# Altium PCB PS3604LR.PcbDoc (part 3 of 3)
Units mm, origin at the board's own origin, x right, y up, seen from the top; angles counter-clockwise.
Board outline 116.5 x 26.5 mm, 4 copper layers (Top Layer, inner 1, inner 2, Bottom Layer), stack 1.571 mm thick; 223 components, 126 nets, 609 pads, 259 vias.
Unrouted connection lines stored in the file: 18.
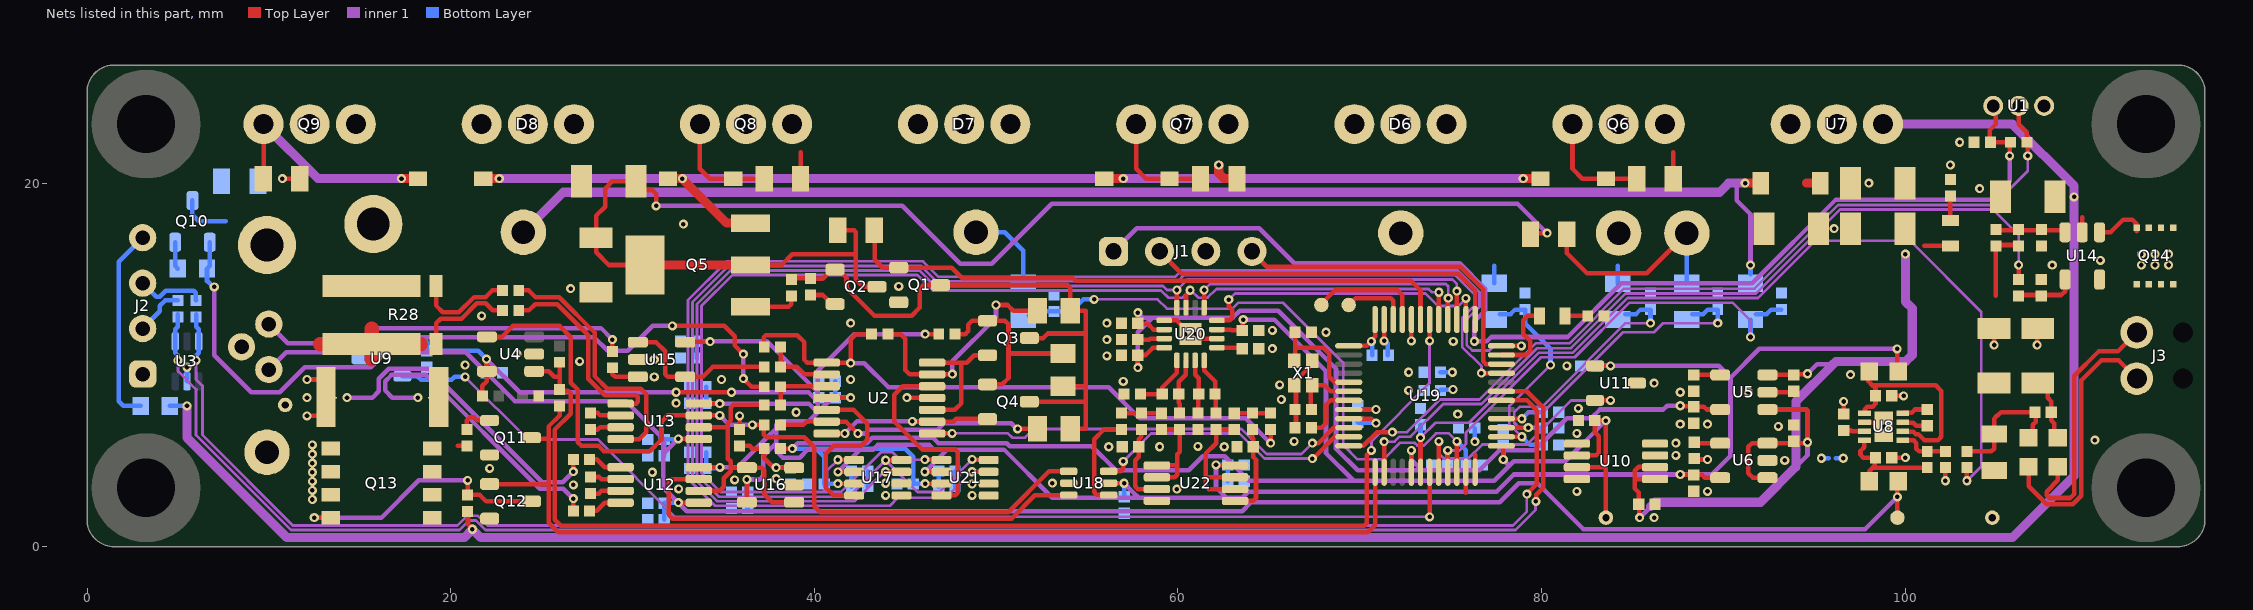
[diagram p4: the nets of this part, all layers, seen from the top]

## Via types
v1: diameter 0.5, hole 0.25, Top Layer to Bottom Layer, tented both sides, 218 vias
v2: diameter 1, hole 0.3, Top Layer to Bottom Layer, 32 vias
v3: diameter 0.5, hole 0.25, Top Layer to Bottom Layer, tented bottom, 6 vias
v4: diameter 0.5, hole 0.4, Top Layer to Bottom Layer, tented both sides, 3 vias

## Nets (pads, with @x,y where several pads share a name; then routed paths per layer and width w, separated by ;. In a path a pad name is that pad's centre, name@x,y a point inside that pad or via, vN(x,y) a via of type N, cw(c..) or ccw(c..) an arc to the next point about the centre after c; other vN are vias at no path point) (continued)
0V: B6.1 B11.1 C3.1 C5.1 C6.1 C7.2 C8.1 C9.1 C11.1 C13.1 C14.1 C15.1 C16.1 C17.1 C18.1 C19.1 C20.1 C22.1 C24.2 C25.2 C26.1 C27.1 C28.1 C29.1 C30.1 C31.2 C32.2 C33.1 C34.1 C35.1 C36.1 C37.1 C38.1 C40.2 C41.2 C42.1 C43.1 C44.1 C45.1 C46.1 C48.1 C49.2 C50.1 C51.1 C52.1 C53.1 C54.1 C55.1 C56.1 C57.1 C58.2 C59.1 C62.1 C63.1 C64.1 C65.1 C66.2 C67.2 C68.1 C69.1 C70.1 C71.1 C74.1 C75.1 C76.1 C77.1 C78.1 C79.1 C80.1 J1.3 J2.1 n1.1 n3.1 Q1.2 Q11.2 Q12.2 Q13.1 Q13.2 Q13.3 R11.1 R20.1 R25.1 R26.1 R36.1 R39.1 R41.1 R42.1 R46.1 R48.1 R52.1 R53.1 R58.1 R60.1 R63.2 TP1.1 TP2.1 U1.1 U2.11 U3.2 U4.2 U5.2 U6.2 U7.2 U9.3 U10.3 U10.4 U10.5 U10.8 U11.3 U14.5 U15.2 U16.2 U17.5 U17.6 U18.2 U19.8 U19.23 U19.44 U19.47 U20.1 U20.10 U20.17 U21.5 U21.6 U22.4 X1.2 X1.4 | length 23
  Top Layer w0.2: X1.4@66.386,9.032 X1.2@67.386,10.032
  Top Layer w0.25: 12.4,7.2 R26.1@12.75,7.2 ; 12.4,9.2 R26.1@12.75,9.2 ; R26.1@13.15,8.25 R26.1@13.15,8.8 ; R41.1@35.9,6.45 v1(35.9,7.2) ; v1(37.9,3.75) v1@37.968,3.75 ; U16.2@38.74,3.56 U16.2@38.9,3.4 ; v1(45.1,8.2) 45.109,8.191 46.195,8.191 U2.11@46.245,8.141 ; U20.1@59.25,12.45 59.95,12.45 U20.17@60.7,11.7 60.95,11.45 U20.10@62.15,11.45 ; C75.1@66.5,6.55 X1.4@66.5,8.8 ; U19.8@69.45,7.55 v1(70.9,7.55) ; v1(71.35,11.322) U19.47@71.35,12.5 ; v1(72.85,11.322) U19.44@72.85,12.5 ; 75.85,2.975 U19.23@75.85,4.1 ; C9.1@88.386,4.8 v1(89.136,4.8) ; U5.2@92.436,8.5 93.836,8.5 C5.1@93.886,8.55 ; v1(104.9,11.1) C45.1@104.9,12 ; v1(107.261,11.1) 107.261,11.961 C44.1@107.3,12 ; C35.1@107.5,14.65 C35.1@107.5,14.7 ; R42.1@107.5,16.55 R42.1@107.5,16.6
  Bottom Layer w0.25: U3.2@5.5,9.1 v1(5.5,9.875) ; C54.1@42.95,3.31 C56.1@42.95,4.163 ; C74.1@47.75,3.31 C76.1@47.75,4.163 ; C68.1@71.536,10.531 v1@71.536,11.181 ; v1(95.4,4.869) n1.1@95.8,4.869
  other v1: 86.2,1.6 12.4,2.6 43.927,2.825 48.682,2.825 81.95,3.05 89.136,3.05 12.4,3.1 59.948,3.175 32.537,3.188 26.75,3.4 48.682,3.45 43.927,3.494 53.1,3.5 12.4,3.6 35.626,3.677 12.4,4.1 31.1,4.1 22.15,4.316 12.4,4.6 93.386,4.75 87.4,5.025 12.4,5.1 56.203,5.504 59,5.502 62.553,5.502 61.1,5.525 12.4,5.6 87.4,5.7 66.4,5.8 110.444,5.869 81.95,6.24 93.036,6.625 87.636,6.75 89.136,6.75 12.1,7.2 75.4,7.3 39,7.4 82.038,7.61 32.4,7.9 65.7,8.1 12.1,8.2 87.636,8.5 91.386,8.5 72.7,8.6 65.6,8.9 86.2,9 57,9.1 12.1,9.2 34.9,9.2 42,9.2 31.2,9.35 97,9.469 72.7,9.6 81.4,9.95 20.8,10 27.093,10.2 31.2,10.3 56.1,10.5 23.65,10.6 65.2,10.9 75.15,11.3 56.1,11.4 60.4,11.7 61,11.7 68.15,11.8 65.2,11.9 42,12.3 56.1,12.3 21.71,12.7 26.6,14.2 44.65,14.325 108.099,15.497 110.75,15.75 96.1,17.5 32.8,17.75 104.1,19.7 98.012,20 102.5,21 103,22.25
  other v4: 104.8,1.6 10.9,7.8
+3.3V: C3.2 C17.2 C63.2 C64.2 C65.2 C66.1 C67.1 C68.2 C71.2 J1.1 R4.2 U1.3 U5.5 U19.1 U19.9 U19.17 U19.24 U19.48 U20.2 U20.4 | length 123
  Top Layer w0.25: v1(57.8,9.856) C66.1@57.8,10.531 57.819,10.55 58.237,10.55 58.631,10.944 59.244,10.944 U20.4@59.25,10.95 ; v1(57.8,12.879) C67.1@57.8,12.3 57.827,12.273 58.339,12.273 58.662,11.95 U20.2@59.25,11.95 ; U19.9@69.45,7.05 70.65,7.05 v1(70.9,6.8) ; U19.1@69.498,11.05 70.4,11.05 v1(70.65,11.3) 70.65,11.368 70.85,11.568 U19.48@70.85,12.5 ; U19.17@72.85,4.1 v1@72.85,5.123 ; U19.24@76.35,4.1 76.35,5.054 ; v1(87.636,7.756) 87.664,7.728 88.358,7.728 C17.2@88.386,7.7 88.936,7.7 89.086,7.55 U5.5@89.836,7.55 ; U1.3@104.98,24.25 104.98,23.23 104.65,22.9 104.65,22.25 R4.2@105.8,22.25 105.75,22.2 v1(105.75,21.5)
  inner 1 w0.25: J1.1@56.46,16.25 57.735,17.525 64.475,17.525 66.4,15.6 75.5,15.6 76.9,14.2 76.9,13 76.304,12.404 76.304,11.315 v1(76.315,11.304) ; v1(57.8,9.856) 57.8,11.795 58.598,12.594 ; v1(57.8,12.879) 58.085,12.594 58.598,12.594 ; v1(72.849,5.299) 72.849,4.779 73.428,4.2 ; v1@76.319,11.304 77.004,11.304 77.24,11.54 81.44,11.54 84.4,14.5 91.6,14.5 96.2,19.1 104.755,19.1 105.75,20.095 v1(105.75,21.5) ; v1(87.636,7.756) 86.913,7.756 86.707,7.55 83.22,7.55 82.735,7.065 81.4,7.065 79.635,5.3 77.694,5.3 76.594,4.2 73.428,4.2 ; 58.598,12.594 63.012,12.594 63.399,12.981 65.519,12.981 68.7,9.8 68.7,5.4 69.9,4.2 73.428,4.2
  Bottom Layer w0.25: C63.2@69.9,6.85 69.925,6.825 70.875,6.825 v1(70.9,6.8) ; v1@70.636,11.281 70.686,11.231 C68.2@70.686,10.531 ; C64.2@74.45,8.6 74.475,8.625 75.111,8.625 v1(75.136,8.65) ; C65.2@74.457,9.607 C65.2@74.45,9.6 v1(75.1,9.6) ; v1@76.33,5.788 76.33,6.526 C71.2@76.336,6.531
  other v1: 76.336,5.788
+5V: C7.1 C15.2 C16.2 C22.2 C24.1 C25.1 C26.2 C27.2 C38.2 C40.1 C41.1 C43.2 C48.2 C49.1 C54.2 C55.2 C56.2 C57.2 C58.1 C74.2 C76.2 L1.1 R10.2 R12.2 U2.4 U4.5 U6.5 U9.1 U11.1 U12.8 U13.8 U15.5 U16.5 U17.2 U18.5 U21.2 U22.8 | length 175
  Top Layer w0.25: R10.2@21.75,8.3 21.75,8.85 22,9.1 U4.5@22,9.65 21.975,9.675 v1(21.975,10.323) ; v1(32.4,8.5) v1(35.45,8.498) ; U15.5@32.9,11.25 32.915,11.265 34.26,11.265 v1(34.275,11.28) ; U12.8@33.65,4.375 33.656,4.369 34.804,4.369 v1(34.81,4.362) ; U13.8@33.65,7.875 v1(34.804,7.875) ; U16.5@36.3,2.45 v1(36.3,3.7) ; U2.4@40.586,8.231 40.626,8.191 41.991,8.191 v1(42,8.2) ; v1(41.307,4.122) 41.309,4.123 42.198,4.123 U17.2@42.2,4.125 ; v1(46.09,4.125) U21.2@47,4.125 ; v1(46.1,11.7) R12.2@46.85,11.7 ; U18.5@56.2,3.5 56.203,3.497 57.047,3.497 v1(57.05,3.494) ; v1(62.1,4.5) 62.112,4.488 63.137,4.488 U22.8@63.15,4.475 ; U11.1@82.95,9.95 v1(83.8,9.95) ; v1(87.636,3.975) 87.648,3.963 88.373,3.963 C16.2@88.386,3.95 88.836,3.95 88.986,3.8 U6.5@89.836,3.8 ; v1(99.568,10.89) 99.568,9.692 L1.1@99.625,9.635
  inner 1 w0.25: v1(21.975,10.323) 23.798,8.5 v1(32.4,8.5) ; v1(34.275,11.28) 34.295,11.3 37.4,11.3 40.186,8.514 ; v1(34.804,7.875) 39.711,7.875 40.186,7.4 ; v1(34.81,4.362) 35.762,4.362 37.45,6.05 37.9,6.5 ; v1(35.45,8.498) 39.687,8.498 40.186,8 ; v1(36.3,3.7) 37,3.7 37.2,3.9 37.2,5 37.9,5.7 ; v1(41.307,4.122) 42.534,5.349 ; v1(42,8.2) 40.986,8.2 40.186,7.4 ; v1(46.09,4.125) 46.094,4.125 47.318,5.349 ; v1(46.1,11.7) 42.2,11.7 40.186,9.686 40.186,8.514 ; v1(57.05,3.494) 57.535,3.009 57.844,2.7 ; v1(62.1,4.5) 62.1,3.28 62.68,2.7 ; v1(83.8,9.95) 89.75,9.95 90.4,9.3 ; v1(99.568,10.89) 91.99,10.89 90.4,9.3 ; 37.9,5.7 37.9,6.5 ; 37.9,5.7 37.9,5.281 38.281,4.9 39.2,4.9 39.649,5.349 42.534,5.349 ; 37.9,6.5 37.9,6.7 38.1,6.9 39.686,6.9 40.186,7.4 ; 40.186,7.4 40.186,8 ; 40.186,8 40.186,8.514 ; 42.534,5.349 43.249,5.349 43.5,5.6 46.325,5.6 46.576,5.349 47.318,5.349 ; 47.318,5.349 50.437,5.349 53.086,2.7 57.844,2.7 ; 57.844,2.7 62.68,2.7 ; 62.68,2.7 63.535,2.7 63.867,3.032 77.532,3.032 78.475,3.975 89.375,3.975 90.4,5 90.4,9.3
  Bottom Layer w0.25: U9.1@17.35,11.28 18.171,11.28 18.3,11.409 18.539,11.409 18.685,11.263 C15.2@18.685,10.78 21.518,10.78 v1(21.975,10.323) 21.963,10.311 21.963,9.582 C7.1@21.95,9.57 C7.1@21.943,9.562 ; C38.2@33.55,10.38 C41.1@33.55,11.3 33.56,11.29 34.265,11.29 v1(34.275,11.28) ; C27.2@34.05,5.2 C25.1@34.05,4.3 34.081,4.331 34.779,4.331 v1(34.81,4.362) ; C26.2@34.05,8.8 C24.1@34.05,7.9 34.062,7.888 34.791,7.888 v1(34.804,7.875) ; v1(36.3,3.7) 36.325,3.675 36.325,2.125 C43.2@36.35,2.1 ; C48.2@41.15,9.1 C49.1@41.15,8.2 v1(42,8.2) ; v1(41.307,4.122) 41.328,4.142 42.03,4.142 C56.2@42.05,4.163 C54.2@42.05,3.31 ; v1(46.09,4.125) 46.109,4.144 46.831,4.144 C76.2@46.85,4.163 C74.2@46.85,3.31 ; C57.2@57.05,2.75 v1(57.05,3.494) ; v1(62.1,4.5) C58.1@62.75,4.5 C55.2@62.75,3.6 ; C22.2@83.05,9.95 v1(83.8,9.95)
+REF: C28.2 C59.2 C62.2 C77.2 C80.2 R40.2 TP4.1 U10.6 U10.7 U17.3 U19.25 U20.11 U21.3 | length 89.4
  Top Layer w0.25: R40.2@38.15,5.4 v1(38.8,5.4) ; v1(41.303,3.475) U17.3@42.2,3.475 ; v1(46.1,3.475) U21.3@47,3.475 ; U20.11@62.15,11.95 62.9,11.95 62.95,11.9 C77.2@63.55,11.9 63.575,11.925 63.575,12.475 v1(63.6,12.5) ; v1(77.9,4.8) U19.25@77.9,5.5 ; U10.7@81.95,4.375 83.55,4.375 ; U10.6@81.95,5.025 83.004,5.025 83.15,5.171 83.15,6.09 82.94,6.3 C28.2@82.94,6.946 ; C28.2@82.938,6.949 C28.2@82.94,6.946 ; v4(83.55,1.603) v1(83.55,6.944) 83.548,6.946 C28.2@82.94,6.946
  inner 1 w0.25: v1(38.8,5.4) 39.1,5.7 42.9,5.7 43.2,6 46.534,6 46.834,5.7 50.581,5.7 50.756,5.525 55.275,5.525 56.6,4.2 60.6,4.2 61.375,4.975 62.573,4.975 63.917,3.631 69.669,3.631 ; v1(63.6,12.5) 65.3,12.5 68.15,9.65 68.15,5.15 69.669,3.631 ; v1(77.9,4.8) 78.238,4.462 ; v1(83.55,6.944) 81.303,4.697 78.473,4.697 78.238,4.462 ; 69.669,3.631 77.407,3.631 78.238,4.462
  Bottom Layer w0.25: v1(38.8,5.4) 40.1,5.4 ; v1(41.303,3.475) 41.29,3.463 40.562,3.463 C59.2@40.55,3.45 40.55,4.95 40.1,5.4 ; v1@46.137,3.438 v1(46.1,3.475) 46.087,3.463 45.462,3.463 C80.2@45.45,3.45 45.45,4.95 45,5.4 40.1,5.4 ; v1(77.9,4.8) C62.2@77.9,5.55
-4.5V: C29.2 C30.2 C31.1 C32.1 L2.2 Q10.1 R19.1 TP3.1 U12.5 U13.5 | length 117.3
  Top Layer w0.25: v1(32.531,2.425) U12.5@33.65,2.425 ; v1(32.531,5.937) 32.537,5.931 33.644,5.931 U13.5@33.65,5.925 ; TP3.1@99.585,1.603 v1(99.585,2.74) 99.585,3.56 L2.2@99.625,3.6
  inner 1 w0.25: v1(7,14.3) 7,10.535 9.035,8.5 10.6,8.5 11.975,9.875 15.598,9.875 16.423,10.7 20.84,10.7 23.54,8 29.65,8 31.7,5.95 31.7,5.106 ; v1(32.531,5.937) 31.7,5.106 ; v1(99.585,2.74) 99.581,2.74 97.816,0.975 82.302,0.975 79.784,3.494 78.744,3.494 77.7,2.45 64.026,2.45 63.535,1.959 32.997,1.959 v1(32.531,2.425) 31.7,3.256 31.7,5.106
  Bottom Layer w0.25: Q10.1@6.75,16.75 6.75,15.45 R19.1@6.6,15.3 6.6,14.6 6.632,14.6 6.932,14.3 v1(7,14.3) ; C32.1@31.75,1.5 C30.2@31.75,2.4 31.763,2.413 32.519,2.413 v1(32.531,2.425) ; C31.1@31.75,5 C29.2@31.75,5.9 31.769,5.919 32.512,5.919 v1(32.531,5.937)
ADC_NSS: U19.38 U20.12 | length 16.8
  Top Layer w0.25: U20.12@62.15,12.45 62.151,12.451 62.854,12.451 63,12.597 63,13.025 62.804,13.221 62.804,13.596 v1(62.8,13.6) ; U19.38@75.85,12.5 v1(75.85,13.66)
  inner 1 w0.15: v1(62.8,13.6) 62.813,13.6 63.142,13.93 73.62,13.93 74.3,13.25 75.44,13.25 v1(75.85,13.66)
CC_CV: U2.8 U19.10 | length 24.5
  Top Layer w0.25: U2.8@46.331,6.236 47.584,6.236 v1(47.588,6.24) ; v1(67.4,5.7) 67.735,5.7 68.585,6.55 U19.10@69.4,6.55
  inner 1 w0.15: v1(47.588,6.24) 50.652,6.24 50.892,6 51.6,6 52.081,6.481 63.5,6.481 64.881,5.1 66.8,5.1 67.381,5.681 v1@67.386,5.681
CON_RX: J2.2 R5.1 | length 2.8
  Bottom Layer w0.25: J2.2@3.065,12 4.011,12.946 4.011,13.266 4.295,13.55 R5.1@5,13.55
CON_TX: J2.3 R6.1 | length 3.8
  Bottom Layer w0.25: J2.3@3.065,14.5 3.804,13.761 4.011,13.761 4.325,14.075 5.874,14.075 5.979,13.97 5.979,13.571 R6.1@6,13.55
CON_VP: J2.4 R7.1 | length 10.8
  Bottom Layer w0.25: R7.1@2.95,7.75 2,7.75 1.75,8 1.75,15.685 J2.4@3.065,17
DAC1_OUT1: R37.1 U19.14 | length 44.9
  Top Layer w0.25: U19.14@71.35,4.1 v1(71.35,5.788) ; R37.1@106.25,14.7 v1(106.25,15.5)
  inner 1 w0.15: v1(71.35,5.788) 71.356,5.781 71.928,5.781 72.203,6.056 72.805,6.056 74.599,7.85 76.695,7.85 79.77,10.925 81.625,10.925 84.63,13.93 91.807,13.93 96.428,18.55 104.85,18.55 106.25,17.15 v1(106.25,15.5)
G1: D5.1 Q9.1 R17.1 | length 12.7
  Top Layer w0.25: R17.1@9.7,20.25 9.71,20.26 Q9.1@9.71,23.25
  Top Layer w0.5: v1(17.3,20.25) D5.1@18.2,20.25
  inner 1 w0.5: Q9.1@9.71,23.25 12.71,20.25 v1(17.3,20.25)
G2: D4.1 Q8.1 R16.1 | length 6.4
  Top Layer w0.25: Q8.1@33.71,23.25 33.71,20.79 34.25,20.25 35.5,20.25 R16.1@37.4,20.25
G3: D3.1 Q7.1 R15.1 | length 6.4
  Top Layer w0.25: Q7.1@57.71,23.25 57.71,20.79 58.25,20.25 R15.1@61.4,20.25
G4: D2.1 Q6.1 R14.1 | length 6.4
  Top Layer w0.25: Q6.1@81.71,23.25 81.71,20.79 82.25,20.25 R14.1@85.4,20.25
I_ADC: C72.2 R59.1 U22.1 U22.2 | length 5.9
  Top Layer w0.25: U22.2@58.85,3.825 59.829,3.825 59.975,3.971 59.975,4.475 ; U22.1@58.85,4.475 59.975,4.475 ; C72.2@59,6.45 R59.1@60.1,6.45 60.1,5.217 59.975,5.092 59.975,4.475
I_MEAS: R2.1 U4.4 U13.7 U18.1 | length 45
  Top Layer w0.25: U4.4@22,11.55 22.825,11.55 23.429,12.154 25.993,12.154 26.618,11.529 26.618,9.03 27,8.648 27,5.746 27.198,5.548 28.137,5.548 28.435,5.25 30.95,5.25 31.6,5.9 31.6,6.875 31.95,7.225 U13.7@33.65,7.225 v1(34.804,7.225) ; v1(36.6,6.7) 37.221,6.7 R2.1@37.236,6.686 ; R2.1@37.25,6.7 37.243,6.693 R2.1@37.236,6.686 ; U18.1@54,4.15 52.917,4.15 50.67,1.902 40.322,1.902 39.994,2.231 39.994,5.48 39.449,6.025 37.382,6.025 37.236,6.171 R2.1@37.236,6.686
  inner 1 w0.25: v1(34.804,7.225) 35.329,6.7 v1(36.6,6.7)
I_MEAS_L: U12.7 U18.3 | length 26.1
  Top Layer w0.25: U12.7@33.65,3.725 32.169,3.725 32,3.556 32,1.75 32.198,1.552 50.857,1.552 52.136,2.831 U18.3@53.986,2.831
I_SET: U2.5 U17.4 | length 9.1
  Top Layer w0.25: U2.5@40.686,7.531 42.164,7.531 42.925,6.77 42.925,5.894 42.581,5.55 41.069,5.55 40.625,5.106 40.625,3.258 41.058,2.825 41.627,2.825
IFAN_ADC: C51.2 R56.2 U19.18 | length 49.9
  Top Layer w0.25: U19.18@73.35,4.1 v1(73.35,6) ; v1(103.4,3.631) R56.2@103.4,4.35
  inner 1 w0.15: v1(73.35,6) 74.174,6.824 76.023,6.824 79.874,10.675 81.729,10.675 84.733,13.68 91.911,13.68 95.069,16.838 100.262,16.838 104.2,12.9 104.2,4.431 v1(103.4,3.631)
  Bottom Layer w0.25: v1(73.35,6) C51.2@73.35,6.71
IVGND: C10.2 C21.2 C23.2 n1.2 R24.1 U8.2 U8.9 | length 4.4
  Top Layer w0.25: C21.2@96.625,7.3 v1(96.625,7.99) ; U8.2@97.775,6.85 98.575,6.85 v1(98.825,6.6) ; C23.2@99.275,4.9 v1(100.025,4.9) ; C10.2@99.275,8.3 v1(99.925,8.3) ; v1(102.225,3.631) R24.1@102.225,4.35
  Bottom Layer w0.25: n1.2@96.2,4.869 v1(96.6,4.869)
LED1: LD2.2 U19.35 | length 4.5
  Top Layer w0.25: U19.35@77.8,10.55 79.15,10.55 79.396,10.796 79.396,11.304 79,11.7 79,12.45 79.25,12.7 LD2.2@79.9,12.7
NEG: B8.1 R28.I1
NetC1_1: C1.1 R1.2 U2.13 | length 12.7
  Top Layer w0.25: R1.2@44.05,11.7 44.763,11.7 45.013,11.45 45.013,9.721 45.243,9.491 47.591,9.491 v1(47.6,9.5) ; v1(50,13.3) 50.634,13.3 50.953,12.981 C1.1@52.286,12.981
  inner 1 w0.25: v1(47.6,9.5) 47.6,10.2 50,12.6 v1(50,13.3)
NetC1_2: C1.2 C2.2 C4.1 Q1.3 Q2.1 Q3.3 Q4.3 R8.1 R9.1 | length 35.4
  Top Layer w0.25: R9.1@38.736,14.775 38.748,14.762 39.787,14.762 R8.1@39.8,14.75 40.475,14.75 40.773,15.048 40.773,15.053 40.97,15.25 Q2.1@41.15,15.25 41.33,15.25 41.775,14.805 41.775,14.25 43.317,12.708 45.358,12.708 45.794,13.144 45.794,14.2 45.994,14.4 Q1.3@46.95,14.4 53.939,14.4 54.086,14.254 C1.2@54.086,12.981 54.936,12.981 54.936,11.731 ; Q4.3@51.836,7.981 54.936,7.981 ; Q3.3@51.836,11.481 52.596,11.481 52.846,11.731 54.936,11.731 ; C4.1@53.686,8.831 54.936,8.831 ; C2.2@54.086,6.481 54.936,6.481 54.936,7.981 ; 54.936,7.981 54.936,8.831 ; 54.936,8.831 54.936,11.731
NetC2_1: C2.1 R2.2 U2.6 | length 14.9
  Top Layer w0.25: R2.2@38.15,6.7 39.405,6.7 39.605,6.9 40.667,6.9 U2.6@40.686,6.881 41.75,6.881 v1(42.4,6.231) ; v1(51.186,6.481) C2.1@52.286,6.481
  inner 1 w0.25: v1(42.4,6.231) 42.806,6.231 43,6.425 46.763,6.425 47.138,6.8 50.829,6.8 51.148,6.481 v1(51.186,6.481)
NetC4_2: C4.2 Q3.1 Q4.1 R12.1 | length 10.8
  Top Layer w0.25: R12.1@47.75,11.7 48.314,11.7 48.461,11.846 48.461,12.21 48.682,12.431 50.486,12.431 50.686,12.231 50.686,10.631 ; Q4.1@49.536,8.931 50.336,8.931 50.686,9.281 50.686,10.631 ; C4.2@53.686,10.631 50.686,10.631
NetC8_2: C8.2 U5.4 | length 1.5
  Top Layer w0.25: C8.2@88.386,9.45 U5.4@89.836,9.45
NetC9_2: C9.2 U6.4 | length 1.5
  Top Layer w0.25: C9.2@88.386,5.7 U6.4@89.836,5.7
NetC10_1: C10.1 L1.2 U8.1 U8.6 | length 11.7
  Top Layer w0.25: U8.1@97.775,7.35 97.775,7.554 97.921,7.7 98.215,7.7 98.375,7.86 C10.1@98.375,8.3 98.375,8.714 98.207,8.882 ; L1.2@98.025,9.635 97.972,9.582 97.972,9.116 98.207,8.882 ; U8.6@99.875,6.35 99.9,6.325 100.455,6.325 100.58,6.2 100.737,6.2 101.068,5.869 101.812,5.869 102,6.057 102,8.569 101.687,8.882 98.207,8.882
NetC11_2: C11.2 D1.1 U7.1 | length 0.8
  Top Layer w0.5: 94.586,20 D1.1@95.34,20
NetC12_1: C12.1 U8.8 | length 1.4
  Top Layer w0.25: U8.8@99.875,7.35 99.9,7.375 100.375,7.375 100.55,7.55 C12.1@101.225,7.55
NetC12_2: C12.2 U8.7 | length 1.4
  Top Layer w0.25: U8.7@99.875,6.85 99.9,6.825 100.45,6.825 100.625,6.65 C12.2@101.225,6.65
NetC13_2: C13.2 C14.2 Q2.3 Q5.2 Q5.4 R3.2 R21.1 | length 80.1
  Top Layer w0.25: Q5.4@30.7,15.5 28.7,15.5 28.004,16.196 28.004,16.996 C13.2@28,17 28,18.2 28.5,18.7 28.5,19.7 28.9,20.1 C14.2@30.2,20.1 30.2,20.075 30.65,19.625 31.1,19.625 31.3,19.425 v1(31.3,18.75) ; Q5.2@36.927,15.5 38.2,15.5 38.8,16.1 42.2,16.1 ; R3.2@41.3,17.4 42.2,17.4 42.286,17.314 42.286,14.714 42.696,14.304 43.446,14.304 Q2.3@43.45,14.3 ; R21.1@79.45,17.25 v1(80.31,17.25)
  Top Layer w0.5: Q5.4@30.7,15.5 Q5.2@36.5,15.5
  inner 1 w0.25: v1(31.3,18.75) 44.85,18.75 48.033,15.567 49.767,15.567 53.075,18.875 78.685,18.875 v1(80.31,17.25)
NetC21_1: C21.1 U8.3 | length 1.2
  Top Layer w0.25: C21.1@96.625,6.4 97.025,6.4 97.075,6.35 U8.3@97.775,6.35
NetC23_1: C23.1 L2.1 R27.1 U8.4 | length 6.1
  Top Layer w0.25: U8.4@97.775,5.85 97.75,5.825 97.75,5.469 97.55,5.269 97.55,5.061 97.711,4.9 C23.1@98.375,4.9 ; L2.1@98.025,3.6 98.025,4.154 98.271,4.4 ; C23.1@98.325,4.85 98.325,4.35 R27.1@101.225,4.35
NetC35_2: C35.2 R37.2 U14.4 | length 3.3
  Top Layer w0.25: R37.2@106.25,13.85 107.5,13.85 108.6,13.85 108.809,14.059 U14.4@108.809,14.712
NetC37_2: C37.2 R40.1 R41.2 U16.3 | length 4.6
  Top Layer w0.25: R41.2@35.9,5.55 36.45,5.55 36.6,5.4 R40.1@37.25,5.4 37.25,4.871 37.771,4.35 U16.3@38.9,4.35
  Bottom Layer w0.25: v1(37.9,4.35) C37.2@38.7,4.35
NetC39_1: C39.1 R42.2 R44.1 U14.3 | length 3.7
  Top Layer w0.25: C39.1@105,17.4 106.25,17.4 107.5,17.4 U14.3@108.721,17.4
NetC39_2: C39.2 C44.2 C45.2 C47.2 L3.1 Q14.5 Q14.6 Q14.7 Q14.8 R44.2 | length 6.4
  Top Layer w0.25: 105,13.8 C39.2@105,16.55 ; C39.2@105,16.6 R44.2@106.25,16.6 ; C44.2@107.844,8.55 107.844,8.196 108.05,7.99 C47.2@108.05,7.4 108.039,7.389 108.039,6.96 108.217,6.782 L3.1@108.217,6.283
  other v3: 113,15.5 113.75,15.5 114.5,15.5 113,16.1 113.75,16.1 114.5,16.1
NetC47_1: C47.1 L4.1 R53.2 R56.1 | length 6.9
  Top Layer w0.25: R56.1@103.4,5.25 104.75,5.25 104.9,5.4 R53.2@104.9,6.2 104.9,7.054 105.046,7.2 105.083,7.2 105.283,7.4 C47.1@107.15,7.4 107.19,7.36 107.19,6.86 107.034,6.704 L4.1@107.034,6.234
NetC60_1: C60.1 R58.2 U20.7 | length 3
  Top Layer w0.25: U20.7@60.95,10.25 60.95,9.468 61.15,9.268 C60.1@61.15,8.4 61.125,8.375 61.125,7.375 R58.2@61.1,7.35
NetC60_2: C60.2 R57.2 U20.8 | length 3.2
  Top Layer w0.25: U20.8@61.45,10.25 61.446,10.246 61.446,9.695 62.05,9.091 C60.2@62.05,8.4 62.075,8.375 62.075,7.375 R57.2@62.1,7.35
NetC61_1: C61.1 R60.2 U20.5 | length 3.3
  Top Layer w0.25: R60.2@57.95,8.4 C61.1@59.05,8.4 ; C61.1@59.15,8.4 59.15,8.76 59.95,9.56 U20.5@59.95,10.25
NetC61_2: C61.2 R59.2 U20.6 | length 3.1
  Top Layer w0.25: R59.2@60.1,7.35 60.1,7.86 60.05,7.91 60.05,9.081 60.441,9.472 60.441,10.241 U20.6@60.45,10.25
NetC69_2: C69.2 R64.2 U22.3 | length 4.5
  Top Layer w0.25: R64.2@58,6.45 58,6.056 57.85,5.906 57.85,4.96 57.65,4.76 57.65,3.321 57.796,3.175 U22.3@58.85,3.175
NetC70_2: C70.2 R65.2 U22.5 | length 5.1
  Top Layer w0.25: U22.5@63.15,2.525 64.154,2.525 64.3,2.671 64.3,4.785 64.15,4.935 C70.2@64.15,5.5 64.154,5.504 64.154,5.934 64.1,5.987 R65.2@64.1,6.45
NetC72_1: C72.1 R61.2 R64.1 | length 2.1
  Top Layer w0.25: R61.2@56.9,7.35 R64.1@58,7.35 C72.1@59,7.35
NetC73_1: C73.1 R62.2 R65.1 | length 2
  Top Layer w0.25: C73.1@63.1,7.35 R65.1@64.1,7.35 R62.2@65.1,7.35
NetC78_2: C78.2 U20.3 | length 1.5
  Top Layer w0.25: C78.2@57.8,11.4 58.438,11.4 58.488,11.45 U20.3@59.25,11.45
NetC79_2: C79.2 U20.9 | length 1.4
  Top Layer w0.25: U20.9@62.15,10.95 63.5,10.95 C79.2@63.55,10.9
NetD2_2: D2.2 D3.2 D4.2 D5.2 Q5.3 | length 64.8
  Top Layer w0.5: D5.2@21.8,20.25 v1(22.675,20.25) ; D4.2@31.95,20.25 v1(32.75,20.25) 35.2,17.8 Q5.3@36.5,17.8 ; D3.2@55.95,20.25 v1(57,20.25) ; v1(79,20.25) D2.2@79.95,20.25
  inner 1 w0.5: v1(22.675,20.25) v1(32.75,20.25) v1(79,20.25)
NetD6_2: D6.2 Q6.3 Q7.2 R14.2 | length 1.4
  Top Layer w0.254: R14.2@87.25,20.25 87.25,21.691
NetD7_2: D7.2 Q7.3 Q8.2 R15.2 | length 1.7
  Top Layer w0.5: v1(62.25,21) 62.25,20.55 62.55,20.25 R15.2@63.25,20.25 R15.2@63.1,20.25
NetD8_2: D8.2 Q8.3 Q9.2 R16.2 | length 1.4
  Top Layer w0.25: R16.2@39.25,20.25 39.25,21.69
NetJ3_1: J3.1 L4.2 | length 14.8
  Top Layer w0.25: L4.2@106.8,4.4 106.8,3.321 107.788,2.333 109.228,2.333 109.7,2.805 109.7,9.15 110.799,10.249 111.751,10.249 J3.1@112.75,9.25
NetJ3_2: J3.2 L3.2 | length 14.4
  Top Layer w0.25: L3.2@108.4,4.4 108.4,3.65 107.787,3.037 107.787,2.829 107.933,2.683 109.083,2.683 109.3,2.9 109.3,9.4 110.645,10.745 111.705,10.745 J3.2@112.75,11.79
NetLD1_1: LD1.1 R25.2 | length 1.3
  Top Layer w0.25: LD1.1@102.5,18 R25.2@102.5,19.3 R25.2@102.5,19.35
NetLD2_1: LD2.1 R63.1 | length 1.3
  Top Layer w0.25: LD2.1@81.3,12.7 R63.1@82.55,12.7
Netn2_1: n2.1 Q13.5 Q13.6 Q13.7 Q13.8 R23.2 R26.2 R28.I2 | length 2.8
  Top Layer w0.25: 20.4,5.55 R23.2@20.9,5.55
  Top Layer w0.8: 12.825,11.15 R28.I2@13.15,11.15 ; 15.65,10.323 R28.I2@15.65,11.15 15.65,12 ; R28.I2@18.1,11.15 18.35,11.15
Netn2_2: n2.2 R31.1 | length 16.5
  Top Layer w0.25: R31.1@26.75,1.97 v1(26.75,2.65)
  inner 1 w0.25: v1(18.2,8.2) 16.798,8.2 16.4,8.598 16.4,9.105 16.745,9.45 18.65,9.45 24.9,3.2 26.2,3.2 v1(26.75,2.65)
Netn3_2: n3.2 R32.1 | length 17
  Top Layer w0.25: v1(26.75,4.131) R32.1@26.75,4.8
  inner 1 w0.25: v1(14.3,8.2) 15.702,8.2 16.05,8.548 16.05,9.25 16.6,9.8 18.795,9.8 25.038,3.557 26.175,3.557 v1(26.75,4.131)
NetQ2_2: Q2.2 R8.2 | length 1.6
  Top Layer w0.25: R8.2@39.8,13.85 40.475,13.85 40.773,13.552 40.773,13.547 40.97,13.35 Q2.2@41.15,13.35
NetQ3_2: Q3.2 U2.10 U2.14 | length 7.2
  Top Layer w0.25: U2.10@46.486,7.531 47.729,7.531 48.1,7.902 48.1,10.1 ; U2.14@46.486,10.131 48.4,10.131 48.8,10.531 Q3.2@49.536,10.531
NetQ4_2: Q4.2 U2.7 U2.9 | length 8.9
  Top Layer w0.25: U2.7@40.686,6.231 v1(41.686,6.231) ; v1(45.4,6.9) 45.409,6.891 U2.9@46.203,6.891 ; U2.9@46.486,6.881 47.651,6.881 47.818,7.048 49.519,7.048 Q4.2@49.536,7.031
  inner 1 w0.25: v1(41.686,6.231) 42.355,6.9 v1(45.4,6.9)
NetQ5_1: Q5.1 R9.2 | length 2.8
  Top Layer w0.25: Q5.1@36.5,13.2 38.589,13.2 38.736,13.346 R9.2@38.736,13.875
NetQ10_2: Q10.2 R19.2 | length 1.5
  Bottom Layer w0.25: Q10.2@4.85,16.75 4.85,15.45 R19.2@5,15.3
NetQ11_1: Q11.1 R23.1 | length 1.9
  Top Layer w0.25: R23.1@20.9,6.45 20.9,6.966 21.046,7.112 21.3,7.112 21.464,6.948 22.148,6.948 Q11.1@22.15,6.95
NetQ12_3: Q12.3 Q13.4 R22.1 | length 14.7
  Top Layer w0.25: v1(12.5,1.6) 13.4,1.6 Q13.4@13.405,1.595 ; v1(20.932,3.651) R22.1@20.932,2.85 21.6,2.85 21.95,2.5 Q12.3@24.45,2.5 ; v1@20.932,3.656 v1@20.938,3.65
  inner 1 w0.25: v1(12.5,1.6) 12.505,1.595 16.195,1.595 18.251,3.651 v1(20.932,3.651)
NetQ14_4: Q14.4 U14.1 | length 2.8
  Top Layer w0.25: U14.1@110.709,17.312 111.312,17.312 112,18 112.5,18 112.75,17.75 112.75,17.35
NetR24_2: R24.2 R27.2 U8.5 | length 2.8
  Top Layer w0.25: U8.5@99.875,5.85 100.477,5.85 100.625,5.702 100.625,5.396 100.771,5.25 R27.2@101.225,5.25 R24.2@102.225,5.25
NetR28_E1: R28.E1 R29.1 | length 5.4
  Top Layer w0.25: R28.E1@19.2,14.35 19.2,13.275 19.575,12.9 20.455,12.9 21.291,13.736 21.936,13.736 22.3,14.1 R29.1@22.85,14.1
NetR28_E2: R28.E2 R30.1 | length 5.4
  Top Layer w0.25: R28.E2@19.2,11.15 19.2,12.3 19.45,12.55 20.6,12.55 21.436,13.386 21.936,13.386 22.321,13.001 R30.1@22.85,13 R30.1@22.85,13
NetR29_2: R29.2 U13.4 | length 14.4
  Top Layer w0.25: R29.2@23.75,14.1 24.3,14.1 24.673,13.727 25.979,13.727 27.918,11.789 27.918,9.394 28.618,8.694 30.462,8.694 30.75,8.406 30.75,6.3 30.375,5.925 U13.4@29.35,5.925
NetR30_2: R30.2 U13.1 | length 11.5
  Top Layer w0.25: R30.2@23.75,13 24.298,13 24.648,13.35 25.861,13.35 27.568,11.644 27.568,9.249 28.473,8.344 30.2,8.344 30.3,8.244 30.3,7.975 30.2,7.875 U13.1@29.35,7.875
NetR31_2: R31.2 U12.4 | length 1.9
  Top Layer w0.25: R31.2@27.65,1.97 28.034,1.97 28.034,1.99 28.469,2.425 U12.4@29.35,2.425
NetR32_2: R32.2 U12.1 | length 1.9
  Top Layer w0.25: R32.2@27.65,4.8 27.66,4.81 28.034,4.81 28.469,4.375 U12.1@29.35,4.375
NetR33_1: R33.1 U13.2 | length 1.7
  Top Layer w0.25: R33.1@27.7,7.35 27.711,7.361 28.1,7.361 28.236,7.225 U13.2@29.35,7.225
NetR33_2: R33.2 U13.3 | length 1.7
  Top Layer w0.25: R33.2@27.7,6.45 28.1,6.45 28.225,6.575 U13.3@29.35,6.575
NetR34_1: R34.1 U12.2 | length 1.7
  Top Layer w0.25: R34.1@27.686,3.831 27.692,3.838 28.168,3.838 28.28,3.725 U12.2@29.35,3.725
NetR34_2: R34.2 U12.3 | length 1.7
  Top Layer w0.25: R34.2@27.686,2.931 27.692,2.925 28.146,2.925 28.296,3.075 U12.3@29.35,3.075
NetR43_2: R43.2 U15.3 | length 1.8
  Top Layer w0.25: R43.2@28.9,9.85 28.9,9.496 29.046,9.35 30.046,9.35 U15.3@30.3,9.35
NetR49_2: R49.2 R54.1 U2.3 | length 3.5
  Top Layer w0.25: R54.1@38.15,7.8 R49.2@38.15,8.8 38.181,8.831 U2.3@40.686,8.831
NetR50_1: R50.1 U15.1 U15.4 | length 8.7
  Top Layer w0.25: U15.1@30.3,11.25 31.3,11.25 31.8,10.75 31.8,9.496 31.946,9.35 U15.4@32.9,9.35 33.881,9.35 34.431,9.9 R50.1@37.25,9.9
NetR50_2: R50.2 R55.1 U2.2 | length 3.8
  Top Layer w0.25: R55.1@38.15,11 R50.2@38.15,9.9 39.045,9.9 39.464,9.481 U2.2@40.686,9.481
NetR61_1: R61.1 U18.4 | length 5.5
  Top Layer w0.25: U18.4@56.2,2.85 55.546,2.85 55.4,2.996 55.4,5.911 55.939,6.45 R61.1@56.854,6.45
NRST: C75.2 U19.7 | length 3.4
  Top Layer w0.25: C75.2@67.3,6.55 C75.2@67.35,6.55 67.9,6.55 68.15,6.8 68.15,7.8 68.4,8.05 69.45,8.05 U19.7@69.498,8.05
ON_OFF: Q1.1 R3.1 U19.43 | length 33.9
  Top Layer w0.25: R3.1@43.3,17.4 43.334,17.366 43.334,15.791 43.775,15.35 47.575,15.35 48.15,14.775 54.236,14.775 54.386,14.625 72.825,14.625 73.35,14.1 U19.43@73.35,12.5
POS: B7.1 Q9.3 Q10.3 R17.2 R20.2 | length 3.6
  Top Layer w0.25: v1@10.81,20.25 R17.2@11.7,20.25
  Bottom Layer w0.25: Q10.3@5.8,19.05 5.8,18.254 6.154,17.9 ; 6.176,17.9 7.622,17.9
  other v1: 10.75,20.25
R\N\G\_\H\I\: Q11.3 Q12.1 R18.2 U19.13 | length 59.5
  Top Layer w0.25: Q12.1@22.15,3.45 25.363,3.45 ; Q11.3@24.45,6 24.513,5.937 25.35,5.937 ; 25.388,1.338 25.388,3.45 25.388,5.937 25.388,6.615 25.994,7.221 25.994,7.744 R18.2@26,7.75 ; 25.405,1.32 25.925,0.8 70.449,0.8 70.85,1.201 U19.13@70.85,4.1
RCC_OSC_IN: C52.2 U19.5 X1.3 | length 6
  Top Layer w0.25: X1.3@66.45,10.276 66.45,10.95 C52.2@66.45,11.8 ; 66.55,10.95 68,10.95 68.323,10.627 68.323,9.353 68.626,9.05 U19.5@69.45,9.05
RCC_OSC_OUT: C53.2 U19.6 X1.1 | length 3.7
  Top Layer w0.25: C53.2@67.3,7.55 67.3,8.875 X1.1@67.399,8.875 68.075,8.875 68.4,8.55 U19.6@69.498,8.55
RNG: U18.6 U19.11 | length 15.4
  Top Layer w0.25: U18.6@56.2,4.15 56.854,4.15 57,4.296 v1(57,4.7) ; v1(67.4,4.85) 67.438,4.85 68.638,6.05 U19.11@69.4,6.05
  inner 1 w0.15: v1(57,4.7) 58.531,6.231 63.396,6.231 64.778,4.85 v1(67.4,4.85)
RNG_OVF: R13.2 R18.1 U4.1 U19.42 | length 68.5
  Top Layer w0.25: U4.1@24.6,9.65 25.398,9.65 25.694,9.354 26,9.354 ; R18.1@26,8.65 26,9.354 ; R13.2@26,10.15 26,9.354 ; R18.1@26.034,8.584 26.454,8.584 26.6,8.437 26.6,7.312 25.737,6.45 25.737,1.482 26.07,1.15 70.254,1.15 70.4,1.296 70.4,5.029 70.65,5.279 v1(70.65,5.3) ; v1(73.85,11.322) U19.42@73.85,12.5
  inner 1 w0.15: v1(70.65,5.3) 70.65,5.8 73.85,9 v1(73.85,11.322)
S+: B9.1 R49.1 | length 31.3
  Top Layer w0.25: v1(32.2,12.154) 35.046,12.154 35.626,11.574 35.626,11.074 v1(36.1,10.6) ; v1(36.1,9.25) 36.55,8.8 R49.1@37.25,8.8
  inner 1 w0.25: B9.1@10,9.75 10.95,10.7 15.3,10.7 16.13,11.53 27.886,11.53 28.641,10.775 29.743,10.775 31.122,12.154 v1(32.2,12.154) ; v1(36.1,9.25) v1(36.1,10.6)
S-: B10.1 R43.1 | length 20.6
  Top Layer w0.25: R43.1@28.9,10.75 v1(28.9,11.4)
  inner 1 w0.25: B10.1@10,12.25 11.05,11.2 15.093,11.2 15.923,12.03 28.27,12.03 v1(28.9,11.4)
SPI3_CLK: U17.8 U19.39 U20.16 U21.8 | length 75.4
  Top Layer w0.25: v1(43.929,4.759) 43.937,4.767 44.792,4.767 U17.8@44.8,4.775 ; v1(48.682,4.81) 48.699,4.792 49.582,4.792 U21.8@49.6,4.775 ; v1(59.948,14.125) 59.95,14.123 U20.16@59.95,13.15 ; U19.39@75.35,12.5 v1(75.35,14.067)
  inner 1 w0.15: v1(48.682,4.81) 46.88,3.009 45.679,3.009 43.927,4.76 41.926,2.759 34.748,2.759 33.556,3.951 33.556,13.36 35.396,15.2 45.781,15.2 46.631,14.35 59.179,14.35 59.404,14.125 v1(59.948,14.125) 60.523,14.7 75.1,14.7 75.35,14.45 v1(75.35,14.067)
SPI3_MISO: U19.40 U20.13 | length 16.4
  Top Layer w0.25: v1(61.446,14.125) 61.448,14.123 61.448,13.152 U20.13@61.45,13.15 ; U19.40@74.85,12.5 74.85,13.65 v1(74.875,13.675)
  inner 1 w0.15: v1(61.446,14.125) 61.771,14.45 74.754,14.45 74.875,14.329 v1(74.875,13.675)
SPI3_MOSI: U17.1 U19.41 U20.15 U21.1 | length 71.8
  Top Layer w0.25: v1(41.298,4.785) 41.303,4.78 42.195,4.78 U17.1@42.2,4.775 ; v1(46.09,4.793) 46.099,4.784 46.991,4.784 U21.1@47,4.775 ; U20.15@60.45,13.15 60.45,13.85 60.676,14.076 v1(60.676,14.112) ; U19.41@74.35,12.5 74.354,12.504 74.354,13.996 v1(74.358,14)
  inner 1 w0.15: v1(41.298,4.785) 40.7,4.186 40.7,3.256 40.453,3.009 ; v1(46.09,4.793) 44.717,4.793 44.31,5.2 43.669,5.2 41.478,3.009 40.453,3.009 ; v1(60.676,14.112) 60.264,13.7 59.475,13.7 59.075,14.1 46.527,14.1 45.677,14.95 35.5,14.95 33.806,13.256 33.806,4.055 34.852,3.009 40.453,3.009 ; v1@60.706,14.049 60.776,14.049 61.125,13.7 61.644,13.7 62.123,14.18 73.8,14.18 73.98,14 v1(74.358,14)
SPI3_NSS2: U19.36 U21.7 | length 80.6
  Top Layer w0.25: v1(48.682,4.125) U21.7@49.6,4.125 ; U19.36@77.85,11.05 v1(78.9,11.05)
  inner 1 w0.15: v1@48.679,4.122 47.257,2.7 44.61,2.7 44.169,2.259 34.541,2.259 33.056,3.744 33.056,13.567 35.189,15.7 45.988,15.7 46.838,14.85 59.848,14.85 60.198,15.2 75.4,15.2 76.6,14 76.6,13.2 75.89,12.49 75.89,11.11 76.2,10.8 77.14,10.8 77.371,11.031 v1@78.886,11.031
SPI3_NSS3: U17.7 U19.33 | length 73.3
  Top Layer w0.25: v1(43.927,4.125) U17.7@44.8,4.125 ; v1(76.7,9.55) U19.33@77.8,9.55
  inner 1 w0.15: v1(43.927,4.125) 43.85,4.125 42.234,2.509 34.645,2.509 33.306,3.847 33.306,13.463 35.293,15.45 45.884,15.45 46.734,14.6 60,14.6 60.35,14.95 75.25,14.95 76.35,13.85 76.35,13.304 75.64,12.594 75.64,11 76.7,9.94 v1(76.7,9.55)
SWCLK: J1.2 U19.37 | length 19.8
  Top Layer w0.25: J1.2@59,16.25 60.225,15.025 75.431,15.025 76.35,14.106 U19.37@76.35,12.5
SWDIO: J1.4 U19.34 | length 18.6
  Top Layer w0.25: J1.4@64.08,16.25 64.08,16.22 64.887,15.413 75.539,15.413 76.8,14.151 76.8,10.196 76.946,10.05 U19.34@77.8,10.05
TSH1: U9.2 U19.19 | length 62.3
  Top Layer w0.25: v1(73.85,1.646) U19.19@73.85,4.1
  inner 1 w0.15: v1(20.8,9.35) 24.25,5.9 28.1,5.9 32.354,1.646 v1(73.85,1.646)
  Bottom Layer w0.25: U9.2@17.35,9.38 18.17,9.38 18.371,9.179 20.05,9.179 20.221,9.35 v1(20.8,9.35)
TSH2: U11.2 U19.20 | length 14.1
  Top Layer w0.25: U19.20@74.35,4.1 74.354,4.104 74.354,5.796 v1(74.358,5.8) ; U11.2@82.95,8.05 v1(83.8,8.05)
  inner 1 w0.15: v1(74.358,5.8) 74.358,5.142 74.65,4.85 75.975,4.85 76.75,5.625 79.211,5.625 81.636,8.05 v1(83.8,8.05)
UART1_RX: R5.2 U3.4 U19.31 | length 92.4
  Top Layer w0.25: U19.31@77.8,8.55 79.201,8.55 80.1,7.651 80.1,3.246 79.719,2.865 79.719,2.519 v1(79.7,2.5)
  inner 1 w0.15: v1(5,10.25) 5,9.66 6,8.66 6,6.14 11.215,0.925 20.485,0.925 21.01,1.45 21.396,1.45 21.921,0.925 78.575,0.925 79.675,2.025 79.675,2.475 v1(79.7,2.5)
  Bottom Layer w0.25: v1(5,10.25) 5,10.525 4.85,10.675 U3.4@4.85,11.3 4.85,11.35 4.861,11.361 4.861,11.961 5,12.1 R5.2@5,12.65 R5.2@5,12.8
UART1_TX: R6.2 U3.6 U19.30 | length 90.6
  Top Layer w0.25: U19.30@77.8,8.05 79.206,8.05 79.75,7.506 79.75,3.45 v1(79.2,2.9)
  inner 1 w0.15: v1(6,10.25) 6,9.205 6.35,8.855 6.35,6.144 11.319,1.175 20.375,1.175 20.9,1.7 21.5,1.7 22.025,1.175 78.43,1.175 79.2,1.945 v1(79.2,2.9)
  Bottom Layer w0.25: v1(6,10.25) 6,10.525 6.15,10.675 U3.6@6.15,11.3 6.15,11.35 6.139,11.361 6.139,11.961 6,12.1 R6.2@6,12.65 R6.2@6,12.8
UART2_TX: R4.1 U1.2 U19.12 | length 47.4
  Top Layer w0.25: U19.12@69.4,5.55 69.41,5.56 70.21,5.56 70.956,6.306 v1(71.8,6.306) ; U1.2@106.25,24.25 106.25,23.25 106.7,22.8 R4.1@106.7,22.25 106.75,22.2 v1(106.75,21.5)
  inner 1 w0.15: v1(71.8,6.306) 72.616,6.306 74.41,8.1 76.592,8.1 79.682,11.19 81.536,11.19 84.546,14.2 91.724,14.2 96.324,18.8 104.879,18.8 106.75,20.671 v1(106.75,21.5)
UART3_RX: TP5.1 U19.46 | length 3.7
  Top Layer w0.25: TP5.1@69.4,13.3 69.775,13.675 71.704,13.675 71.85,13.529 U19.46@71.85,12.5
UART3_TX: TP6.1 U19.45 | length 6.2
  Top Layer w0.25: TP6.1@67.9,13.369 68.656,14.125 72.075,14.125 72.35,13.85 U19.45@72.35,12.5
V1: B5.1 D1.2 D8.1 D8.3 R35.2 | length 74.5
  Top Layer w0.5: v1(91.2,20) D1.2@92.06,20
  inner 1 w0.25: 90.75,20 90.75,19.05 91.5,18.3 v1(91.5,15.497)
  inner 1 w0.5: B5.1@24,17.3 26.2,19.5 89.8,19.5 90.3,20 90.75,20 v1(91.2,20)
  Bottom Layer w0.25: 91.5,15 v1(91.5,15.497)
V1_ADC: C33.2 R35.1 R36.2 U19.21 | length 26.2
  Top Layer w0.25: U19.21@74.85,4.1 v1(74.85,5.3)
  inner 1 w0.15: v1(74.85,5.3) 75.5,5.3 75.85,5.65 75.85,6.289 79.986,10.425 81.832,10.425 84.837,13.43 90.52,13.43 91.5,12.45 v1(91.5,11.54)
  Bottom Layer w0.25: C33.2@74.862,4.513 C33.2@74.85,4.5 v1(74.85,5.3) v1@74.862,5.288 ; v1(91.5,11.54) R35.1@91.5,12.5 ; R35.1@91.803,12.803 92.403,12.803 92.65,13.05 R36.2@93.2,13.05
V2: B4.1 D7.1 D7.3 R38.2 | length 4.8
  Bottom Layer w0.25: B4.1@48.9,17.3 50.486,17.3 51.5,16.286 ; R38.2@51.5,14.5 51.5,16.286 ; 51.5,16.297 51.5,16.286
V2_ADC: C36.2 R38.1 R39.2 U19.22 | length 34.6
  Top Layer w0.25: U19.22@75.35,4.1 v1(75.35,5.8)
  inner 1 w0.15: v1(55.4,13.613) 58.888,13.613 59.4,13.1 63,13.1 63.33,13.43 65.77,13.43 69.1,10.1 69.1,5.6 69.89,4.81 71.31,4.81 72.224,5.724 73.025,5.724 73.174,5.575 73.532,5.575 74.197,6.24 74.91,6.24 v1(75.35,5.8)
  Bottom Layer w0.25: R38.1@51.803,12.703 52.403,12.703 52.65,12.95 R39.2@53.2,12.95 54.15,12.95 54.813,13.613 v1(55.4,13.613) ; v1(75.35,5.8) 75.85,5.3 C36.2@75.85,4.5
V3: B3.1 D6.1 D6.3 R45.2 | length 0.9
  Bottom Layer w0.25: R45.2@77.4,14.5 77.4,15.45
V3_ADC: C42.2 R45.1 R46.2 U19.26 | length 12.7
  Top Layer w0.25: U19.26@77.8,6.05 v1(78.925,6.05)
  inner 1 w0.15: v1(78.925,6.05) 78.238,6.737 78.238,7.738 v1(80.5,10)
  Bottom Layer w0.25: R45.1@77.703,12.803 78.303,12.803 78.55,13.05 R46.2@79.1,13.05 79.1,12.3 80.5,10.9 v1(80.5,10) ; v1(78.925,6.05) 79.375,5.6 C42.2@80.05,5.6
V4: B2.1 Q6.2 R47.2 | length 0.9
  Bottom Layer w0.25: R47.2@84.2,14.5 84.2,15.45
V4_ADC: C46.2 R47.1 R48.2 U19.27 | length 15.5
  Top Layer w0.25: U19.27@77.8,6.55 v1(79.275,6.55)
  inner 1 w0.15: v1@79.275,6.55 78.779,6.55 78.505,6.824 78.505,7.404 78.801,7.7 80.031,7.7 84.631,12.3 v1(86,12.3)
  Bottom Layer w0.25: v1(79.275,6.55) 79.284,6.54 80.041,6.54 C46.2@80.05,6.531 ; R47.1@84.603,12.803 85.203,12.803 85.45,13.05 R48.2@86,13.05 v1(86,12.3)
V_ADC: C73.2 R57.1 U22.6 U22.7 | length 7.7
  Top Layer w0.25: C73.2@63.1,6.45 R57.1@62.1,6.45 62.106,6.444 62.106,5.704 61.525,5.123 61.525,3.825 ; U22.6@63.15,3.175 61.698,3.175 61.525,3.348 61.525,3.825 ; U22.7@63.15,3.825 61.525,3.825
V_MEAS: R1.1 R55.2 R62.1 U2.1 | length 34.8
  Top Layer w0.25: R55.2@37.25,11 37.236,11.014 37.236,11.537 37.342,11.644 ; 37.35,11.644 39.071,11.644 39.464,11.251 39.464,10.278 39.61,10.131 41.969,10.131 v1(42,10.1) 42,11.414 42.286,11.7 R1.1@43.15,11.7 ; v1(65.1,5.7) R62.1@65.1,6.45
  inner 1 w0.25: v1(42,10.1) 42.75,10.1 44.083,8.767 56.193,8.767 57.895,7.065 63.735,7.065 v1(65.1,5.7)
V_OFFSET: R54.2 U12.6 U13.6 U16.1 U16.4 | length 14.7
  Top Layer w0.25: U12.6@33.65,3.075 34.794,3.075 35.028,3.309 35.028,3.774 35.4,4.146 35.4,4.35 ; U13.6@33.65,6.575 35.254,6.575 ; R54.2@37.25,7.8 35.546,7.8 35.4,7.654 35.4,6.948 35.254,6.802 35.254,6.575 ; U16.1@38.9,2.45 37.688,2.45 37.25,2.888 37.25,4.204 37.104,4.35 U16.4@36.3,4.35 35.4,4.35 ; 35.254,6.575 35.254,4.846 35.4,4.7 35.4,4.35
V_SET: U2.12 U21.4 | length 11.1
  Top Layer w0.25: U2.12@46.486,8.831 44.872,8.831 44.406,8.365 44.406,6.894 45.95,5.35 47.754,5.35 47.9,5.204 47.9,2.971 47.754,2.825 U21.4@47,2.825
VG: B1.1 R21.2 R51.2 | length 11.8
  Top Layer w0.25: R21.2@81.4,17.2 81.4,16.158 82.508,15.05 85.8,15.05 B1.1@88,17.25
  Bottom Layer w0.25: R51.2@88,14.5 B1.1@88,17.25
VG_ADC: C50.2 R51.1 R52.2 U19.28 | length 17.6
  Top Layer w0.25: U19.28@77.8,7.05 77.805,7.045 78.925,7.045 v1(78.93,7.04)
  inner 1 w0.15: v1(78.93,7.04) 79.307,7.417 80.102,7.417 84.485,11.8 86.2,11.8 86.7,12.3 v1(89.7,12.3)
  Bottom Layer w0.25: v1(78.93,7.04) 79.289,7.4 C50.2@80.05,7.4 ; R51.1@88.303,12.803 88.903,12.803 89.15,13.05 R52.2@89.7,13.05 v1(89.7,12.3)
VSYS: C5.2 C6.2 C18.2 C19.2 C20.2 C34.2 LD1.2 Q14.1 Q14.2 Q14.3 R7.2 R22.2 U5.1 U5.3 U6.1 U6.3 U7.3 U10.1 U10.2 U14.2 | length 188.7
  Top Layer w0.25: R22.2@20.932,1.95 20.957,1.926 20.957,1.235 21.2,0.992 v1(21.2,0.964) ; v1(85.4,1.6) 85.375,1.625 85.375,2.308 C19.2@85.35,2.333 85.35,2.987 85.134,3.203 85.134,3.693 ; U10.1@86.25,3.725 85.166,3.725 85.134,3.693 ; U10.2@86.25,4.375 86.225,4.4 85.35,4.4 85.134,4.184 85.134,3.693 ; U6.1@92.436,3.8 91.636,3.8 91.386,4.05 91.386,5.5 91.586,5.7 U6.3@92.436,5.7 v1@94.586,5.7 ; U5.1@92.436,7.55 94.586,7.55 94.636,7.5 v1(94.636,5.75) ; U5.3@92.436,9.45 C5.2@93.886,9.45 93.92,9.484 94.601,9.484 v1(94.636,9.519) ; 101.05,16.55 LD1.2@102.5,16.55 ; U14.2@109.759,17.312 109.759,18.134
  inner 1 w0.25: v1(85.4,1.6) 86.006,2.206 ; 94,4.4 94.636,5.036 v1(94.636,5.75) ; v1(94.636,9.519) 95.161,10.044 96.054,10.044
  inner 1 w0.5: v1(5.5,7.75) 5.5,6 11,0.5 20.75,0.5 v1@21.2,0.95 ; v1(21.2,0.964) 21.664,0.5 105.9,0.5 109.3,3.9 109.3,19.85 105.9,23.25 U7.3@98.79,23.25 ; 86.006,2.206 86.25,2.45 92.05,2.45 94,4.4 94,7.99 96.054,10.044 96.21,10.2 100.05,10.2 100.4,10.55 100.4,13.112 100.025,13.488 v1(100.025,16.1)
  Bottom Layer w0.25: R7.2@4.55,7.75 v1(5.5,7.75)
  other v1: 109.3,19.25
pads on no net: J3.3 J3.4 MH1.MH1 MH2.MH2 MH3.MH3 MH4.MH4 U3.1 U3.3 U3.5 U19.2 U19.3 U19.4 U19.15 U19.16 U19.29 U19.32 U20.14
copper on no net:
  other v2: 3.25,0.964 113.25,0.964 1.634,1.634 4.866,1.634 111.634,1.634 114.866,1.634 0.964,3.25 5.536,3.25 110.964,3.25 115.536,3.25 1.634,4.866 4.866,4.866 111.634,4.866 114.866,4.866 3.25,5.536 113.25,5.536 3.25,20.964 113.25,20.964 1.634,21.634 4.866,21.634 111.634,21.634 114.866,21.634 0.964,23.25 5.536,23.25 110.964,23.25 115.536,23.25 1.634,24.866 4.866,24.866 111.634,24.866 114.866,24.866 3.25,25.536 113.25,25.536

## Polygon pours and split planes (outlines as drawn)
0V on Top Layer "0V_L01_P046" (solid, remove dead copper, pour order 46): 8,21.25 7.5,21.75 7.5,25.75 7,26.25 0.25,26.25 0.25,0.25 116.25,0.25 116.25,26.25 95.5,26.25 95,25.75 95,21.25
Netn2_1 on Top Layer "NONET_L-01_P-001" (solid, pour order 41): 12,12 12.6,12.6 19.009,12.6 19.5,12.109 20.5,11.109 20.5,1.5 19.5,0.5 14.6,0.5 14.032,1.068 13.843,8.157 12,10
VSYS on Top Layer "VSYS_L01_P040" (solid, pour order 40): 106.75,18 110.25,18 111.5,16.75 116.25,16.75 116.25,21.5 106.75,21.5
NetC39_2 on Top Layer "NETC39_2_L01_P039" (solid, pour order 39): 116.25,16.5 111.5,16.5 111.25,16 111.25,14 103.9,14 103.9,9.09 116.25,9.09
+3.3V on Top Layer "+3.3V_L01_P038" (solid, pour order 38): 70.4,11.55 70.4,5.05 76.9,5.05 76.9,11.55
NetD6_2 on Top Layer "NETD6_2_L01_P037" (solid, pour order 37): 54.75,21.25 54.25,21.75 54.25,25.75 54.75,26.25 89.5,26.25 90,25.75 90,21.75 89.5,21.25 73.25,21.25
V2 on Top Layer "V2_L01_P035" (solid, pour order 35): 46.075,14.925 42.5,18.5 42.5,25.75 43,26.25 53.5,26.25 54,25.75 54,18.5 50.425,14.925
NetD8_2 on Top Layer "NETD8_2_L01_P034" (solid, pour order 34): 8.25,21.25 7.75,21.75 7.75,25.75 8.25,26.25 41.75,26.25 42.25,25.75 42.25,21.75 41.75,21.25 25.25,21.25
NEG on Top Layer "NEG_L01_P033" (solid, pour order 33): 12,20.4 12.6,21 18.89,21 19.5,20.39 19.5,13.455 18.945,12.9 12.6,12.9 12,13.5
NetC11_2 on Top Layer "NETC11_2_L01_P032" (solid, pour order 32): 94.75,25.75 94.25,26.25 90.75,26.25 90.5,26 90.25,25.75 90.25,16 94.75,16
VSYS on Top Layer "VSYS_L01_P036" (solid, pour order 36): 101.25,16.5 101.25,25.75 100.75,26.25 99.25,26.25 98.75,25.75 98.75,16.5 99.25,16 100.75,16
0V on Bottom Layer "0V_L04_P031" (solid, pour order 31): 0.25,0.25 0.25,26.25 7.5,26.25 7.5,14.25 8,13.75 17.75,13.75 19,15 29,15 30,16 30,21.25 89.5,21.25 89.5,25.75 90,26.25 116.25,26.25 116.25,0.25
V4 on Bottom Layer "V4_L04_P028" (solid, pour order 28): 78.25,15.75 78.25,25.75 78.75,26.25 88.75,26.25 89.25,25.75 89.25,15.75 88.75,15.25 78.75,15.25
NEG on Bottom Layer "NEG_L04_P029" (solid, pour order 29): 13.123,14 13.123,19.693 13.623,20.193 17.873,20.193 18.373,19.693 18.373,15.943 18.373,14
POS on Bottom Layer "POS_L04_P023" (solid, pour order 23): 7.5,25.75 8,26.25 17.75,26.25 18.25,25.75 18.25,14.5 17.75,14 8,14 7.5,14.5
V1 on Bottom Layer "V1_L04_P025" (solid, pour order 25): 19,15.25 18.5,15.75 18.5,25.75 19,26.25 29.75,26.25 30.25,25.75 30.25,15.75 29.75,15.25
V3 on Bottom Layer "V3_L04_P027" (solid, pour order 27): 67,15.75 67,25.75 67.5,26.25 77.5,26.25 78,25.75 78,15.75 77.5,15.25 67.5,15.25
NetD7_2 on Bottom Layer "NETD7_2_L04_P026" (solid, pour order 26): 30.5,25.75 31,26.25 66.25,26.25 66.75,25.75 66.75,20.5 66.25,20 31,20 30.5,20.5
NetC39_2 on Bottom Layer "NETC39_2_L04_P024" (solid, pour order 24): 116.25,18.25 111.25,18.25 111.25,11 111.75,10.5 115.5,10.5 116.25,10.5
0V on inner 2 "Layer 2-0V" (solid, pour order 48): 0.25,26.25 0.25,0.25 116.25,0.25 116.25,26.25
IVGND on inner 1 "NONET_L-01_P-001" (solid, pour order 47): 96.25,9.5 96.75,10 102.5,10 103,9.5 103,3 102.25,2.25 96.75,2.25 96.25,2.75

## Keep-outs
Keep-Out Layer:
  the board outline again, w0.1

## Other copper
Top Layer:
  pour cut-out: 59.675,12.75 58.925,12.75 58.925,12.55 59.675,12.55

## Silkscreen, mask and mechanical layers (free items; w line width, h text height)
Top Overlay:
  text "V" at 54,15.6 h1.2
  text "P" at 115.6,13.75 h0.8
  text "S-" at 7.151,12 h1
  text "S+" at 7.151,8.95 h1
  text "N" at 115.8,7.1 h0.8 r180
  text "PS3604LR V3.5" at 65,0.7 h1.2
Bottom Overlay:
  drawing of 5 lines, arcs and shapes, not listed
  text "VP" at 0.8,16.3 h0.8 r270
  text "TX" at 0.75,13.75 h0.8 r270
  text "RX" at 0.75,11.5 h0.8 r270
  text "GND" at 0.75,8.5 h0.8 r270
Top Solder:
  drawing of 5 lines, arcs and shapes, not listed
Bottom Solder:
  drawing of 3 lines, arcs and shapes, not listed

## Dimensions
3.25,3.25 to 113.25,3.25 on Mechanical 14
0,1.5 to 116.5,1.5 on Mechanical 14
3.25,3.25 to 3.25,23.25 on Mechanical 14
1.5,0 to 1.5,26.5 on Mechanical 14

## Text inside footprints (layer, text, board x,y; h text height)
J3: Top Overlay "1" at 110.972,9.123 h1 r90; Top Overlay "2" at 110.972,11.409 h1 r90